# Altium PCB pyBehaviorLab_breakout_board.PcbDoc (part 3 of 4)
Units mm, origin at the board's own origin, x right, y up, seen from the top; angles counter-clockwise.
Board outline 190.01 x 159.89 mm, 2 copper layers (Top Layer, Bottom Layer); 146 components, 148 nets, 758 pads, 634 vias.
Unrouted connection lines stored in the file: 29.
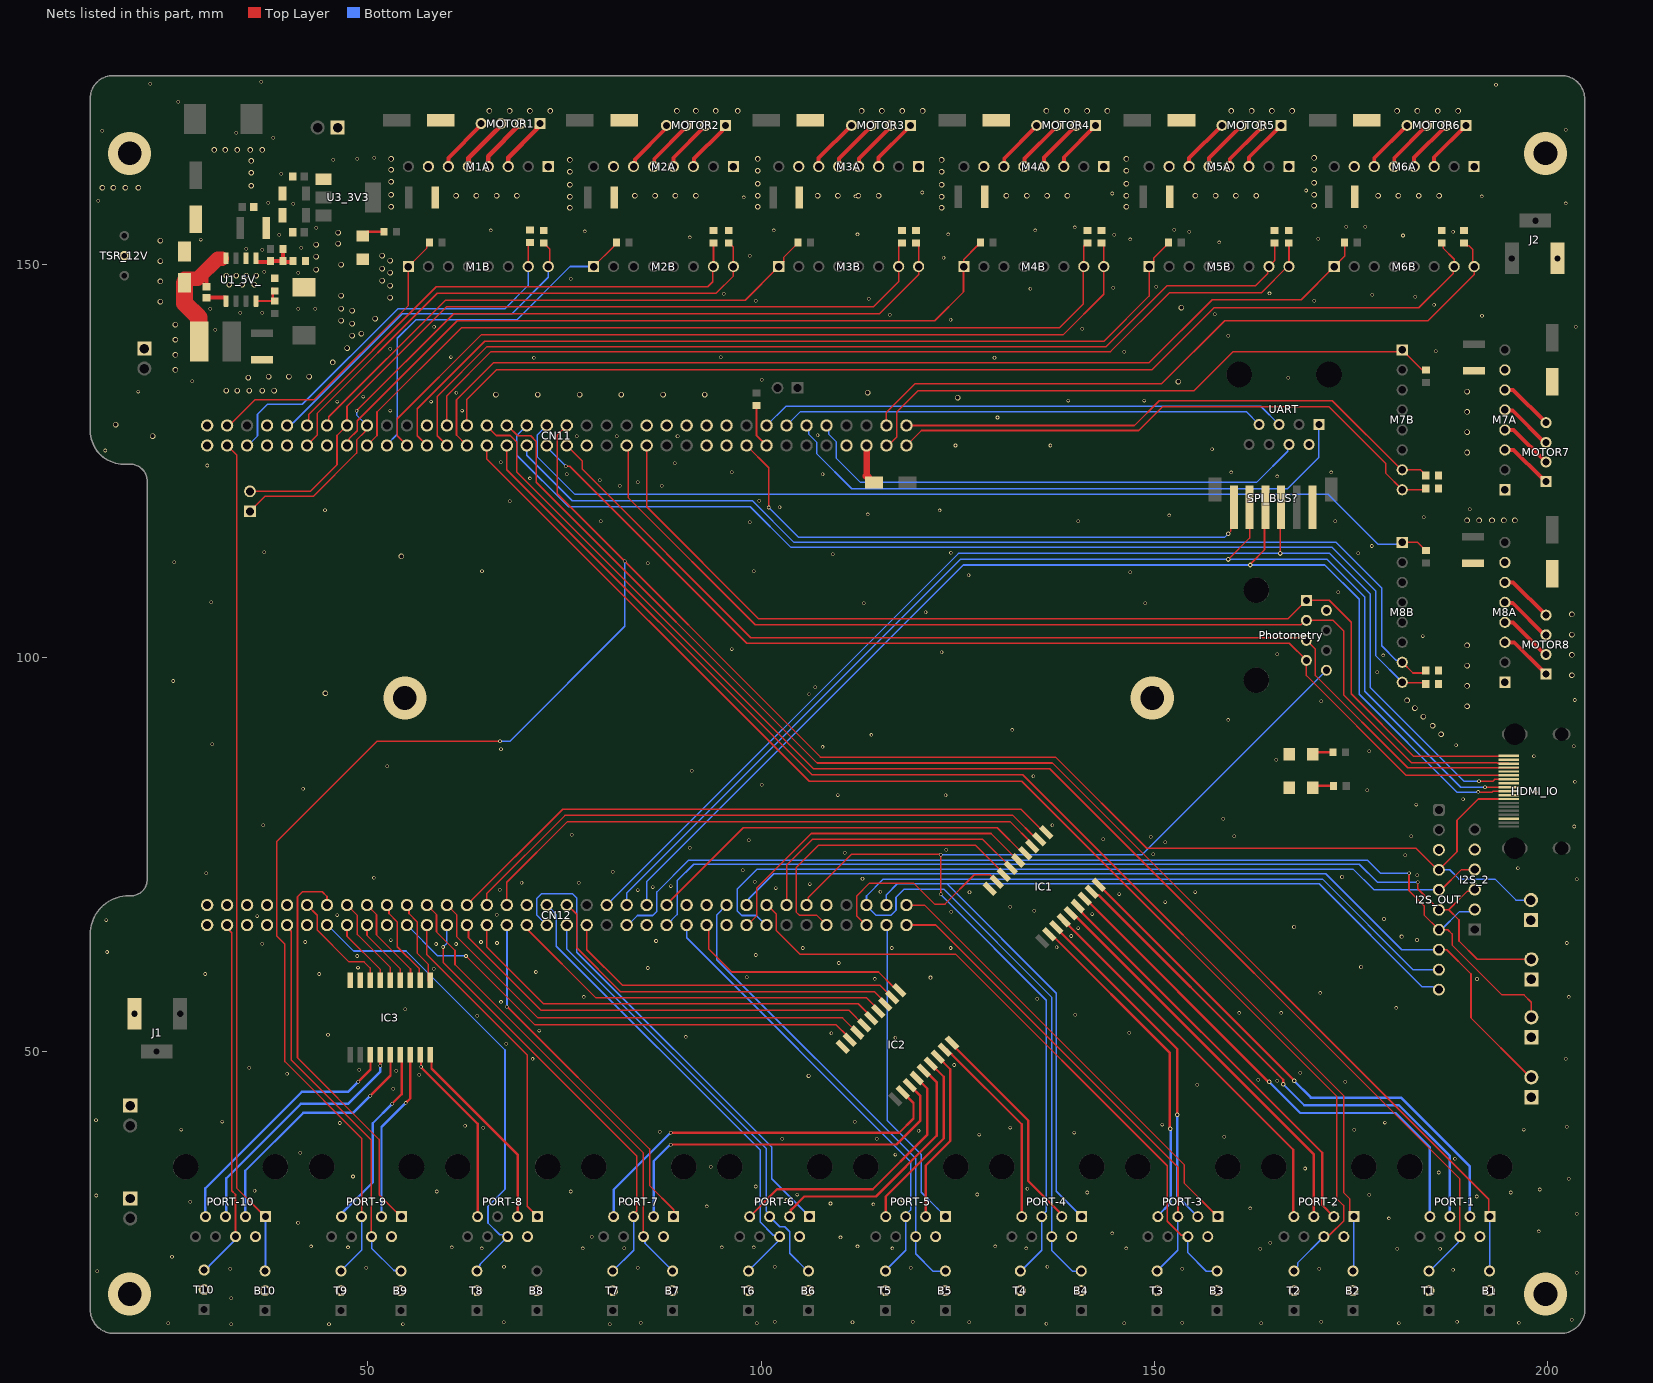
[diagram p2: the nets of this part, all layers, seen from the top]

## Via types
v1: diameter 0.45, hole 0.3, Top Layer to Bottom Layer, tented both sides, 413 vias
v2: diameter 0.7, hole 0.5, Top Layer to Bottom Layer, tented bottom, 173 vias
v3: diameter 0.6, hole 0.3, Top Layer to Bottom Layer, tented both sides, 12 vias
v4: diameter 0.5, hole 0.3, Top Layer to Bottom Layer, tented both sides, 10 vias
v5: diameter 0.5, hole 0.35, Top Layer to Bottom Layer, tented both sides, 7 vias
v6: diameter 5.5, hole 3, Top Layer to Bottom Layer, tented bottom, 6 vias
v7: diameter 0.6, hole 0.305, Top Layer to Bottom Layer, tented both sides, 6 vias
v8: diameter 0.8, hole 0.4, Top Layer to Bottom Layer, tented both sides, 2 vias
v9: diameter 0.45, hole 0.305, Top Layer to Bottom Layer, tented both sides, 2 vias
v10: diameter 0.7, hole 0.3, Top Layer to Bottom Layer, tented both sides, 1 vias
v11: diameter 0.4, hole 0.3, Top Layer to Bottom Layer, tented both sides, 1 vias
v12: diameter 3, hole 3, Top Layer to Bottom Layer, tented both sides, 1 vias

## Nets (pads, with @x,y where several pads share a name; then routed paths per layer and width w, separated by ;. In a path a pad name is that pad's centre, name@x,y a point inside that pad or via, vN(x,y) a via of type N, cw(c..) or ccw(c..) an arc to the next point about the centre after c; other vN are vias at no path point) (continued)
GND: 3V3.1 5V_OUT1.1 5V_OUT2.1 12V.1 12V_OUT1.1 12V_OUT2.1 +5V.1 B1.2 B2.2 B3.2 B4.2 B5.2 B6.2 B7.2 B8.2 B9.2 B10.2 C1.1 C2.1 C3.2 C5.1 C6.2 C7.1 C8.2 C9.2 C10.1 CN11.8 CN11.19 CN11.20 CN11.22 CN11.49 CN11.60 CN11.71 CN11.72 CN12.9 CN12.20 CN12.39 CN12.54 CN12.63 CN12.71 CN12.72 D3.2 HDMI_IO.2 HDMI_IO.5 HDMI_IO.8 HDMI_IO.11 HDMI_IO.17 I2S_2.5 I2S_OUT.3 IC1.9 IC2.9 IC3.8 IC3.9 IO1.1 IO2.1 IO3.1 IO4.1 J1.2 J2.2 M1A.1 M1A.7 M2A.1 M2A.7 M3A.1 M3A.7 M4A.1 M4A.7 M5A.1 M5A.7 M6A.1 M6A.7 M7A.1 M7A.7 M8A.1 M8A.7 MCAP1_A.1 MCAP1_B.2 MCAP2_A.1 MCAP2_B.2 MCAP3_A.1 MCAP3_B.2 MCAP4_A.1 MCAP4_B.2 MCAP5_A.1 MCAP5_B.2 MCAP6_A.1 MCAP6_B.2 MCAP7_A.1 MCAP7_B.2 MCAP8_A.1 MCAP8_B.2 Photometry.2 PORT-1.2 PORT-2.2 PORT-3.2 PORT-4.2 PORT-5.2 PORT-6.2 PORT-7.2 PORT-8.2 PORT-9.2 PORT-10.2 R2.2 R4.2 R13.2 R14.2 R16.2 R17.2 R19.2 R20.2 R22.2 R23.2 R25.2 R26.2 R28.2 R29.2 R31.2 R32.2 R34.2 R35.2 SPI_BUS?.6 T1.2 T2.2 T3.2 T4.2 T5.2 T6.2 T7.2 T8.2 T9.2 T10.2 TSR_12V.2 U1_5V_.6 U3_3V3.1 UART.2
  other v1: 32.621,15.275 45.067,15.275 54.465,15.275 80.754,15.275 136.271,15.367 24.62,15.402 99.423,15.402 146.159,15.402 163.558,15.402 181.084,15.402 84.709,15.494 153.543,15.494 196.342,15.494 67.292,15.529 111.615,15.529 126.474,15.529 101.727,15.621 119.253,15.621 171.196,15.621 188.468,15.621 203.073,15.875 32.621,18.577 203.708,21.844 15.603,22.006 187.96,22.225 32.512,22.352 153.543,22.352 170.942,22.352 49.784,22.479 84.328,22.479 118.999,22.479 67.31,22.606 101.727,22.606 136.398,22.606 25.106,23.85 163.449,24.892 180.848,24.892 186.309,24.892 64.498,24.927 77.325,24.927 116.695,24.927 133.713,24.927 146.413,24.927 82.605,24.937 47.48,25.054 60.688,25.054 94.978,25.054 99.042,25.054 42.781,25.181 112.25,25.181 129.776,25.181 164.719,25.654 110.091,26.324 78.453,26.43 144.635,26.832 198.864,27.086 179.814,28.737 203.708,29.337 162.161,30.007 93.073,30.261 172.72,30.48 114.282,30.515 108.821,30.642 82.677,30.734 27.432,30.861 99.296,30.896 117.965,31.023 103.224,31.088 190.99,31.531 15.476,31.658 177.292,31.75 104.597,31.775 127.49,31.785 141.46,32.039 195.308,32.039 58.783,32.166 75.801,32.166 35.599,32.276 198.965,32.42 133.858,32.512 99.296,32.801 202.692,33.782 48.115,34.071 186.164,34.579 169.146,35.087 93.591,35.331 188.205,36.311 117.076,36.865 41.402,37.084 102.687,38.862 114.692,38.885 158.877,39.116 127.744,39.405 139.809,39.659 87.122,39.751 120.015,39.878 175.387,40.005 26.271,40.04 196.959,40.04 64.69,40.275 131.681,40.294 202.438,40.386 62.357,40.513 150.985,40.675 46.446,40.873 179.306,40.929 111.887,41.021 31.502,41.056 15.443,41.24 53.213,45.212 155.43,45.755 174.244,46.101 165.626,46.246 163.195,46.355 56.554,47.006 39.733,47.152 168.529,47.244 53.594,47.498 48.895,47.625 34.907,47.914 124.551,48.248 70.939,49.013 202.311,49.022 67.611,50.939 117.076,51.724 90.42,51.812 44.94,52.105 108.939,52.297 146.794,52.359 71.786,52.624 63.909,54.511 139.936,54.645 160.782,54.864 166.116,54.864 54.774,55.335 180.721,55.499 66.929,56.261 135.11,56.677 77.47,56.896 202.692,56.896 171.069,57.404 114.427,59.182 98.171,59.38 29.337,59.817 43.815,59.817 71.374,60.071 58.367,60.482 85.598,60.579 48.751,60.632 109.855,61.214 48.641,62.103 99.314,62.23 16.849,62.613 105.283,63.119 116.594,63.119 124.079,63.119 137.556,63.218 58.674,63.627 61.214,63.627 36.558,63.662 66.421,63.754 202.438,63.754 42.037,63.881 64.389,63.881 52.893,64.131 139.446,64.643 140.335,65.659 16.764,66.675 35.941,67.183 46.101,67.31 66.402,67.345 142.113,67.437 124.188,67.726 134.729,67.853 131.681,68.361 151.384,68.961 145.542,69.977 126.489,70.198 155.194,70.231 115.171,70.266 84.328,70.485 66.784,70.52 101.854,70.739 86.233,70.866 88.519,70.993 106.172,71.247 69.54,71.409 76.817,71.409 99.169,71.536 203.708,71.882 112.885,71.917 50.782,72.044 183.388,72.39 29.464,72.644 81.135,72.806 97.663,73.025 196.215,73.279 181.864,74.93 149.86,75.057 110.644,75.238 123.545,75.617 90.914,75.854 151.384,76.581 98.425,76.835 143.51,76.962 149.517,77.247 160.147,77.343 182.626,77.343 75.928,77.505 203.388,78.566 36.703,78.74 137.033,78.74 158.732,79.537 183.261,81.359 189.23,82.042 123.444,82.55 109.728,82.567 198.501,82.931 177.038,83.185 41.765,83.347 100.058,83.855 203.457,84.239 134.62,84.963 91.168,85.633 52.451,86.233 165.463,87.03 198.247,87.503 177.292,88.138 66.929,88.392 107.805,88.681 203.327,88.773 188.341,88.9 30.226,89.027 114.028,90.205 131.935,90.84 159.367,92.11 171.196,94.488 203.436,94.65 150.477,96.174 106.864,96.267 25.255,97.063 178.308,98.171 179.102,100.307 165.608,100.457 122.936,100.711 96.248,101.127 184.132,102.778 120.904,105.791 113.03,106.934 148.844,106.934 30.099,107.061 173.355,108.331 126.365,110.49 146.939,110.871 64.516,110.998 99.042,111.033 85.58,112.049 25.382,112.176 109.093,113.157 175.895,113.284 124.132,113.372 36.83,113.411 177.623,114.227 98.534,117.256 140.335,117.348 172.974,117.348 79.611,117.383 184.259,117.891 151.892,118.11 113.538,118.237 122.682,118.745 44.559,118.78 190.101,118.907 102.344,119.161 68.054,119.923 99.764,119.966 82.024,121.864 87.358,121.864 84.31,122.336 79.496,122.602 70.612,122.809 165.608,123.063 75.293,123.352 107.805,123.352 159.766,123.571 172.466,123.571 96.248,123.606 29.591,124.46 89.009,124.749 66.878,124.864 16.637,126.365 157.323,126.539 136.779,127 76.563,128.178 81.643,128.178 107.17,128.305 52.832,131.445 61.976,131.445 46.101,132.588 58.039,132.588 139.065,132.715 148.717,132.715 49.403,133.223 61.269,133.688 20.828,133.858 27.69,135.171 100.092,135.366 167.005,135.636 71.12,138.176 129.667,138.176 94.887,138.235 60.571,138.247 146.177,138.938 185.783,138.973 52.832,139.319 159.385,140.97 30.607,141.732 140.843,141.859 58.42,142.113 203.581,142.113 124.079,143.002 191.643,143.51 116.332,143.637 157.686,143.699 33.782,143.891 36.576,143.891 29.972,144.399 41.148,144.399 43.307,144.399 185.547,144.907 99.314,145.415 170.307,145.415 113.665,145.669 183.134,145.923 177.673,146.177 95.25,146.304 164.628,146.329 134.239,146.939 144.78,147.066 150.241,147.193 75.819,148.209 41.148,148.971 36.83,149.098 123.19,150.876 98.552,151.13 36.576,151.892 34.544,152.019 41.529,152.146 158.224,152.816 28.778,153.184 146.921,153.197 170.815,153.289 90.914,153.451 38.735,153.797 144.907,153.797 112.25,153.832 123.807,153.832 154.432,154.178 187.96,154.178 77.579,154.213 65.641,154.34 101.582,154.34 134.856,154.34 152.527,154.432 43.434,154.686 139.885,154.719 174.371,154.813 176.784,154.813 40.513,157.734 202.293,157.769 37.338,157.861 15.748,158.115 97.772,158.531 111.996,158.658 191.625,158.658 144.635,159.039 120.505,159.166 169.273,159.42 38.989,161.544 45.593,163.322 48.641,163.449 50.8,163.576 37.973,166.116 33.274,166.751 16.256,167.005 202.311,167.132 25.908,170.688 193.421,172.847 22.352,172.974 36.449,173.228
  other v2: 186.436,90.297 185.358,91.375 184.191,92.542 183.113,93.62 189.738,93.853 182.125,94.608 44.619,95.504 189.738,96.435 203.073,97.79 189.738,99.018 203.073,100.372 189.738,101.6 203.073,102.955 203.073,105.537 54.271,112.903 189.738,117.475 191.262,117.475 192.913,117.475 194.437,117.475 195.834,117.475 189.738,126.111 22.629,128.202 189.738,128.693 17.949,129.667 189.738,131.276 124.968,133.096 66.294,133.477 71.603,133.477 76.911,133.477 82.22,133.477 87.528,133.477 92.837,133.477 113.538,133.731 189.738,133.858 32.004,133.985 33.401,133.985 34.925,133.985 36.576,133.985 38.1,133.985 153.035,135.128 34.798,135.636 37.38,135.763 39.963,135.763 42.545,135.763 25.527,136.605 45.539,137.561 25.527,138.526 47.365,139.387 25.527,140.446 48.006,140.97 49.191,141.213 25.527,142.367 48.006,142.494 46.609,142.875 50.927,143.129 48.006,144.145 46.609,144.399 153.416,144.526 23.622,145.288 52.832,145.796 46.609,146.05 52.832,147.32 32.385,147.447 34.036,147.447 35.56,147.447 23.622,147.87 51.816,147.955 32.004,148.59 33.274,148.59 34.544,148.59 35.814,148.59 52.832,148.971 43.434,149.352 51.816,149.479 46.609,149.987 23.622,150.453 52.832,150.495 43.434,151.003 51.816,151.13 43.434,152.527 46.228,152.654 23.622,153.035 46.228,154.051 75.692,157.226 122.936,157.226 52.959,157.353 99.568,157.353 146.431,157.353 170.307,157.48 75.692,158.623 122.936,158.623 61.214,158.75 63.796,158.75 66.379,158.75 68.961,158.75 83.947,158.75 86.529,158.75 89.112,158.75 91.694,158.75 99.568,158.75 107.188,158.75 109.77,158.75 112.353,158.75 114.935,158.75 131.191,158.75 133.773,158.75 136.356,158.75 138.938,158.75 146.431,158.75 155.194,158.75 157.776,158.75 160.359,158.75 162.941,158.75 178.435,158.75 181.017,158.75 183.6,158.75 186.182,158.75 52.959,158.877 170.307,158.877 16.256,159.766 17.653,159.766 19.177,159.766 20.828,159.766 35.179,160.02 75.692,160.147 122.936,160.147 99.568,160.274 146.431,160.274 170.307,160.401 52.959,160.528 35.179,161.671 75.692,161.798 122.936,161.798 99.568,161.925 146.431,161.925 52.959,162.052 170.307,162.052 35.179,163.195 75.692,163.322 122.936,163.322 52.959,163.449 99.568,163.449 146.431,163.449 170.307,163.576 30.48,164.592 31.877,164.592 33.401,164.592 35.052,164.592 36.576,164.592 65.447,169.545 68.03,169.545 70.612,169.545 73.194,169.545 89.281,169.545 91.694,169.545 94.234,169.545 97.028,169.545 112.776,169.545 115.358,169.545 117.941,169.545 120.523,169.545 136.271,169.545 138.853,169.545 141.436,169.545 144.018,169.545 159.766,169.545 162.348,169.545 164.931,169.545 167.513,169.545 180.848,169.545 183.43,169.545 186.013,169.545 188.595,169.545
  other v4: 41.148,28.194 106.045,46.863 121.529,59.351 86.661,64.014 124.714,127 89.389,128.178 130.048,130.556 181.592,153.705
  other v5: 191,59.192 176.276,60.706 183.388,64.135 181.429,64.557 167.767,65.786 179.197,66.802 173.863,72.136
  other v6: 19.714,19.132 199.714,19.132 54.714,94.904 149.71,94.904 19.714,164.132 199.714,164.132
  other v11: 106.107,95.37
M1_1A: M1A.4 M2A.4 M3A.4 M4A.4 M5A.4 M6A.4 M7A.4 M8A.4 MOTOR1.2 MOTOR2.2 MOTOR3.2 MOTOR4.2 MOTOR5.2 MOTOR6.2 MOTOR7.2 MOTOR8.2 | length 55.6
  Top Layer w0.5: M2A.4@88.859,162.467 88.859,163.584 92.949,167.674 MOTOR2.2@92.949,167.697 ; M3A.4@112.4,162.467 112.432,162.499 112.432,163.503 116.49,167.561 MOTOR3.2@116.49,167.697 ; M4A.4@135.941,162.467 135.941,163.607 MOTOR4.2@140.031,167.697 ; M5A.4@159.482,162.467 159.577,162.562 159.577,163.44 163.4,167.262 163.4,167.525 MOTOR5.2@163.572,167.697 ; M6A.4@183.023,162.467 183.023,163.607 MOTOR6.2@187.113,167.697 ; M8A.4@194.55,104.523 194.584,104.489 195.585,104.489 199.642,100.433 MOTOR8.2@199.781,100.433 ; M7A.4@194.55,128.99 195.666,128.99 MOTOR7.2@199.756,124.9
  Top Layer w0.6: M1A.4@65.318,162.467 65.318,163.789 69.408,167.879 MOTOR1.2@69.408,167.929
M1_1B: M1A.3 M2A.3 M3A.3 M4A.3 M5A.3 M6A.3 M7A.3 M8A.3 MOTOR1.1 MOTOR2.1 MOTOR3.1 MOTOR4.1 MOTOR5.1 MOTOR6.1 MOTOR7.1 MOTOR8.1 | length 55.5
  Top Layer w0.5: M2A.3@91.399,162.467 91.466,162.533 91.466,163.469 94.999,167.002 94.999,167.247 MOTOR2.1@95.449,167.697 ; M3A.3@114.94,162.467 114.94,163.603 118.54,167.203 118.54,167.247 118.946,167.653 MOTOR3.1@118.99,167.653 ; M4A.3@138.481,162.467 138.481,163.647 MOTOR4.1@142.531,167.697 ; M5A.3@162.022,162.467 162.022,163.647 MOTOR5.1@166.072,167.697 ; M6A.3@185.563,162.467 185.563,163.647 MOTOR6.1@189.613,167.697 ; M8A.3@194.55,101.983 195.741,101.983 199.331,98.393 199.331,98.383 199.77,97.943 MOTOR8.1@199.781,97.943 ; M7A.3@194.55,126.45 195.666,126.45 199.266,122.85 199.331,122.85 MOTOR7.1@199.781,122.4
  Top Layer w0.6: M1A.3@67.858,162.467 67.858,163.608 71.508,167.258 71.508,167.529 MOTOR1.1@71.908,167.929
M1_2A: M1A.5 M2A.5 M3A.5 M4A.5 M5A.5 M6A.5 M7A.5 M8A.5 MOTOR1.3 MOTOR2.3 MOTOR3.3 MOTOR4.3 MOTOR5.3 MOTOR6.3 MOTOR7.3 MOTOR8.3 | length 55.8
  Top Layer w0.5: M2A.5@86.319,162.467 86.415,162.563 86.415,163.439 90.449,167.473 MOTOR2.3@90.449,167.697 ; M3A.5@109.86,162.467 109.923,162.53 109.923,163.472 113.99,167.538 MOTOR3.3@113.99,167.697 ; M4A.5@133.401,162.467 133.474,162.54 133.474,163.462 137.531,167.519 MOTOR4.3@137.531,167.697 ; M5A.5@156.942,162.467 156.942,163.567 MOTOR5.3@161.072,167.697 ; M6A.5@180.483,162.467 180.483,163.567 MOTOR6.3@184.613,167.697 ; M8A.5@194.55,107.063 194.623,106.99 195.547,106.99 199.604,102.933 MOTOR8.3@199.781,102.933 ; M7A.5@194.55,131.53 194.623,131.457 195.546,131.457 199.604,127.4 MOTOR7.3@199.781,127.4
  Top Layer w0.6: M1A.5@62.778,162.467 62.786,162.475 62.786,163.539 66.755,167.509 66.755,167.776 MOTOR1.3@66.908,167.929
M1_2B: M1A.6 M2A.6 M3A.6 M4A.6 M5A.6 M6A.6 M7A.6 M8A.6 MOTOR1.4 MOTOR2.4 MOTOR3.4 MOTOR4.4 MOTOR5.4 MOTOR6.4 MOTOR7.4 MOTOR8.4 | length 55.9
  Top Layer w0.5: M1A.6@60.238,162.467 60.238,163.567 64.408,167.737 MOTOR1.4@64.408,167.929 ; M2A.6@83.779,162.467 83.943,162.631 83.943,163.371 87.777,167.204 87.777,167.525 MOTOR2.4@87.949,167.697 ; M3A.6@107.321,162.467 107.321,163.534 MOTOR3.4@111.483,167.697 ; M4A.6@130.861,162.467 130.909,162.514 130.909,163.488 135.031,167.61 MOTOR4.4@135.031,167.697 ; M5A.6@154.402,162.467 154.406,162.471 154.406,163.531 MOTOR5.4@158.572,167.697 ; M6A.6@177.943,162.467 177.947,162.471 177.947,163.531 MOTOR6.4@182.113,167.697 ; M8A.6@194.55,109.603 194.569,109.584 195.601,109.584 199.752,105.433 MOTOR8.4@199.781,105.433 ; M7A.6@194.55,134.07 194.567,134.053 195.602,134.053 MOTOR7.4@199.755,129.9
MCU_3V3: CN11.16 DNP.2 | length 5.3
  Top Layer w0.25: DNP.2@99.426,131.761 99.426,128.267 CN11.16@100.693,127
MCU_5V: CN11.6 D1.1 | length 5.3
  Top Layer w0.8: CN11.6@113.393,127 113.412,126.981 113.412,123.13 ; D1.1@113.58,122.962 113.58,122.661 113.955,122.286 D1.1@114.33,122.286
  Top Layer w1: 113.412,123.13 D1.1@113.58,122.962
Net2K2_1: 2K2.1 12V.2 | length 2.8
  Top Layer w0.3: 12V.2@170.103,83.485 170.348,83.73 2K2.1@172.782,83.73
Net470_1: 3V3.2 220.1 470.1 +5V.2 | length 5.6
  Top Layer w0.3: 3V3.2@49.365,153.634 49.909,154.178 52.04,154.178 220.1@52.042,154.176 ; +5V.2@170.103,87.739 170.363,87.998 470.1@172.711,87.998
NetC4_1: C4.1 D3.1 I1.1 U1_5V_.8 | length 16
  Top Layer w0.5: 29.112,148.942 29.497,148.557 C4.1@29.497,147.208
  Top Layer w1.8: D3.1@26.689,148.209 28.378,148.209 30.918,150.749 31.449,150.749
  Top Layer w2.2: D3.1@26.689,147.67 26.689,145.092 28.497,143.284 28.497,140.277 I1.1@28.572,140.202
NetC4_2: C4.2 U1_5V_.1 | length 2.9
  Top Layer w0.5: C4.2@29.497,145.758 29.542,145.803 31.926,145.803 31.976,145.753 U1_5V_.1@31.976,145.363
NetR1_2: R1.2 R2.1 R5.1 R5.2 U1_5V_.5 | length 7.4
  Top Layer w0.5: U1_5V_.5@35.786,150.774 35.786,150.399 35.836,150.349 R5.1@37.796,150.349 ; R5.1@37.614,150.476 39.207,150.476 R5.2@39.238,150.507 ; R1.2@39.087,152.23 39.238,152.079 R5.2@39.238,150.507 ; R5.2@39.269,150.349 R2.1@40.59,150.349 ; R5.2@39.396,150.349 R5.2@39.238,150.507
NetR3_2: R3.2 R4.1 U1_5V_.4 | length 3.8
  Top Layer w0.3: U1_5V_.4@35.786,145.363 37.886,145.363 R3.2@37.914,145.391 ; R3.2@37.914,145.264 R4.1@37.914,146.918
PA0_CMD: CN11.28 HDMI_IO.1 Photometry.1 | length 137.8
  Top Layer w0.2: CN11.28@85.453,127 85.453,119.199 99.692,104.959 166.963,104.959 Photometry.1@169.319,107.315 172.212,107.315 175.01,104.517 175.01,95.439 182.947,87.503 193.614,87.503 193.62,87.508 193.727,87.508 194.994,87.508 HDMI_IO.1@195.044,87.558
PA1_ADC1: CN11.30 HDMI_IO.3 Photometry.3 | length 137.9
  Top Layer w0.2: CN11.30@82.913,127 83.083,126.83 83.083,120.381 99.264,104.2 168.646,104.2 169.221,104.775 172.705,104.775 174.043,103.438 174.043,95.324 182.714,86.653 193.575,86.653 193.62,86.608 194.994,86.608 HDMI_IO.3@195.044,86.558
PA2_ADC2: CN12.35 IC2.3 | length 47.8
  Top Layer w0.2: CN12.35@75.293,68.58 75.387,68.58 76.549,67.418 76.549,63.151 82.128,57.572 114.404,57.572 IC2.3@115.531,56.445
PA3_ADC3: CN12.37 PORT-6.4 T6.3 | length 60.9
  Bottom Layer w0.2: CN12.37@72.753,68.58 72.753,68.344 72.989,68.344 73.968,67.365 73.968,65.786 ; 73.969,65.785 73.969,63.357 99.875,37.451 99.875,28.277 101.536,26.616 102.164,26.616 PORT-6.4@102.357,26.423 102.128,26.193 102.128,25.809 T6.3@98.398,22.079
PA5_I2S1_SCK: CN12.11 Photometry.8 PORT-4.5 T4.3 | length 138.8
  Top Layer w0.2: CN12.11@105.773,68.58 105.968,68.775 105.968,69.519 111.501,75.052 122.775,75.052 v9@122.829,74.998 ; v9(122.816,74.986) v9@122.829,74.998 ; v9(122.856,69.965) 122.836,69.985 122.836,74.991 v9@122.829,74.998
  Bottom Layer w0.2: v9(122.816,74.986) 122.816,74.991 122.826,75.001 148.435,75.001 Photometry.8@171.859,98.425 ; v9(122.856,69.965) 122.856,69.898 122.981,69.773 122.981,69.752 136.249,56.483 136.249,29.638 135.677,29.065 135.677,24.712 T4.3@133.003,22.038
PA6: CN12.13 IC1.6 | length 36.4
  Top Layer w0.2: CN12.13@103.251,68.58 103.251,73.66 106.54,76.949 128.154,76.949 IC1.6@131.76,73.344
PA7_I2S1_SD: B3.3 CN12.15 PORT-3.4 | length 83.1
  Top Layer w0.2: CN12.15@100.693,68.58 100.763,68.58 101.913,67.431 101.913,65.346 104.909,62.35 124.721,62.35 151.641,35.43 151.641,28.38 153.412,26.608 154.056,26.608 PORT-3.4@154.241,26.423
  Bottom Layer w0.2: PORT-3.4@154.241,26.423 154.241,24.398 156.602,22.038 B3.3@157.965,22.038
PA8: CN12.23
PA9: CN12.21
PA13: CN11.13 UART.7 | length 61.5
  Bottom Layer w0.2: CN11.13@103.233,129.54 105.011,131.318 161.66,131.318 UART.7@163.304,129.674
PA14: CN11.15 UART.5 | length 67.1
  Bottom Layer w0.2: CN11.15@100.693,129.54 103.155,132.002 163.516,132.002 UART.5@165.844,129.674
PA15_NCS: CN11.17 SPI_BUS?.1 | length 72.9
  Top Layer w0.2: CN11.17@98.153,127 100.965,124.188 v4(100.965,119.126) ; v7(159.374,115.781) 159.377,115.781 159.721,116.125 159.721,118.783 SPI_BUS?.1@160.1,119.162
  Bottom Layer w0.2: v4(100.965,119.126) 104.775,115.316 158.908,115.316 v7(159.374,115.781)
PB0_LG: CN11.34
PB1: CN12.24 PORT-5.5 T5.3 | length 57.2
  Bottom Layer w0.2: CN12.24@90.533,66.04 90.533,64.407 119.001,35.939 119.001,29.811 118.382,29.192 118.382,24.712 T5.3@115.708,22.038
PB2: CN12.22 IC2.1 | length 28.8
  Top Layer w0.2: CN12.22@93.073,66.04 93.332,65.781 93.332,63.005 96.266,60.071 114.924,60.071 116.786,58.21 116.969,58.21 IC2.1@117.001,58.241
PB3_SCK: CN12.31 HDMI_IO.7 SPI_BUS?.4 | length 158.2
  Top Layer w0.2: v7(165.989,113.284) 165.989,119.051 SPI_BUS?.4@166.1,119.162 ; v1(191.262,84.328) 193.031,84.328 193.261,84.558 HDMI_IO.7@195.044,84.558
  Bottom Layer w0.2: CN12.31@80.373,68.58 125.077,113.284 v7(165.989,113.284) 172.289,113.284 177.448,108.126 177.448,96.237 189.357,84.328 v1(191.262,84.328)
PB4_MISO: CN12.27 HDMI_IO.10 SPI_BUS?.3 | length 156.5
  Top Layer w0.2: v7(162.196,111.809) 162.196,111.918 162.357,112.079 162.357,112.097 163.996,113.736 163.996,119.058 SPI_BUS?.3@164.1,119.162 ; v1(191.157,82.957) 191.205,82.91 191.382,82.91 191.391,82.901 192.882,82.901 193.048,83.066 HDMI_IO.10@195.036,83.066
  Bottom Layer w0.2: CN12.27@85.453,68.58 85.453,71.561 125.702,111.809 v7(162.196,111.809) 171.655,111.809 176.022,107.442 176.022,95.377 188.476,82.923 191.122,82.923 v1(191.157,82.957)
PB5_MOSI: CN12.29 HDMI_IO.9 SPI_BUS?.2 | length 158
  Top Layer w0.2: v7(159.385,112.522) 162.1,115.237 SPI_BUS?.2@162.1,119.162 ; v1(192.024,83.566) 192.028,83.562 195.04,83.562 HDMI_IO.9@195.044,83.558
  Bottom Layer w0.2: CN12.29@82.913,68.58 82.913,70.108 125.327,112.522 v7(159.385,112.522) 171.967,112.522 176.735,107.754 176.735,95.756 188.925,83.566 v1(192.024,83.566)
PB6: CN12.18 I2S_OUT.8 IO1.2 | length 115.5
  Top Layer w0.2: I2S_OUT.8@186.164,62.9 187.163,62.9 190.246,59.817 190.246,54.229 IO1.2@197.713,46.762
  Bottom Layer w0.2: CN12.18@98.153,68.58 98.415,68.842 98.415,69.366 101.601,72.552 171.774,72.552 181.426,62.9 I2S_OUT.8@186.164,62.9
PB7_LR: CN11.21
PB8_I2C1_SCL: CN12.3 I2S_OUT.10 PORT-4.1 | length 127.2
  Bottom Layer w0.2: CN12.3@115.931,68.582 115.931,69.892 117.313,71.274 123.624,71.274 ; PORT-4.1@140.757,28.963 137.53,32.19 137.53,57.369 123.624,71.274 ; I2S_OUT.10@186.11,57.476 186.11,57.516 185.456,58.17 184.058,58.17 170.955,71.274 123.624,71.274
PB9_I2C1_SDA: B4.3 CN12.5 I2S_OUT.9 PORT-4.4 | length 148.8
  Bottom Layer w0.2: B4.3@140.671,22.038 139.576,22.038 136.947,24.667 PORT-4.4@136.947,26.423 136.927,26.442 136.927,56.884 123.202,70.609 118.192,70.609 117.148,69.564 117.148,67.923 116.517,67.292 114.593,67.292 113.393,68.491 CN12.5@113.393,68.58 113.393,69.744 115.531,71.882 171.351,71.882 182.874,60.36 I2S_OUT.9@186.164,60.36
PB10: CN12.25 IC1.4 | length 51
  Top Layer w0.2: CN12.25@87.993,68.58 87.993,68.67 97.737,78.415 130.027,78.415 133.302,75.14 IC1.4@133.556,75.14
PB11: CN12.17 IC1.5 | length 42.8
  Top Layer w0.2: CN12.17@98.153,66.04 98.257,66.04 99.418,67.2 99.418,70.716 106.377,77.675 129.224,77.675 IC1.5@132.658,74.242
PB12_I2S2_WS: CN12.16 I2S_2.4 I2S_OUT.5 | length 104.2
  Top Layer w0.2: I2S_OUT.5@186.164,70.52 186.471,70.52 189.043,73.092 I2S_2.4@190.724,73.092
  Bottom Layer w0.2: CN12.16@100.693,66.04 100.603,66.04 99.388,67.255 97.524,67.255 96.938,67.841 96.938,70.575 99.52,73.156 175.256,73.156 177.87,70.542 185.304,70.542 186.142,70.542 I2S_OUT.5@186.164,70.52
PB13_I2S2_SCK: CN12.30 I2S_2.2 I2S_OUT.7 IO2.2 | length 137.7
  Top Layer w0.2: v1(182.365,72.619) 182.365,70.408 184.277,68.495 184.277,67.327 I2S_OUT.7@186.164,65.44 187.29,65.44 187.833,64.897 187.833,63.5 194.183,57.15 196.977,57.15 197.914,56.213 IO2.2@197.914,54.31
  Bottom Layer w0.2: CN12.30@82.913,66.04 83.063,66.04 84.278,67.255 86.226,67.255 86.757,67.786 86.757,70.247 90.805,74.295 177.038,74.295 178.69,72.643 182.34,72.643 v1(182.365,72.619) ; I2S_OUT.7@186.164,65.44 186.471,65.44 188.785,67.754 190.466,67.754 I2S_2.2@190.724,68.012
PB14_LB: CN12.28
PB15_I2S2_SD: CN12.26 I2S_2.3 I2S_OUT.6 IO3.2 | length 127.1
  Top Layer w0.2: v1(183.482,71.47) 183.482,70.662 I2S_OUT.6@186.164,67.98 187.417,67.98 ; I2S_2.3@190.724,70.552 190.531,70.359 189.797,70.359 187.417,67.98 ; IO3.2@197.914,61.676 191.054,61.676 188.722,64.008 188.722,66.675 187.417,67.98
  Bottom Layer w0.2: CN12.26@87.993,66.04 89.319,67.366 89.319,68.075 89.318,68.077 89.318,69.083 89.319,69.085 89.319,71.657 91.431,73.769 176.04,73.769 178.313,71.496 183.456,71.496 v1(183.482,71.47)
PC0_ADC: CN11.38 HDMI_IO.6 Photometry.7 | length 142.1
  Top Layer w0.2: v1(75.174,124.368) 75.667,124.368 98.166,101.869 167.145,101.869 Photometry.7@169.319,99.695 169.319,97.762 181.991,85.09 HDMI_IO.6@196.215,85.09
  Bottom Layer w0.2: CN11.38@72.753,127 72.753,126.825 75.174,124.404 v1(75.174,124.368)
PC1_ADC: CN11.36 HDMI_IO.4 Photometry.5 | length 140.4
  Top Layer w0.2: CN11.36@75.293,127 77.269,125.024 77.269,124 98.692,102.577 168.652,102.577 168.994,102.235 Photometry.5@169.319,102.235 170.47,101.084 170.47,97.754 182.189,86.035 HDMI_IO.4@196.221,86.035
PC2: CN11.35 HDMI_IO.12 I2S_OUT.4 IO4.2 PORT-9.5 T9.3 | length 293.5
  Top Layer w0.2: PORT-9.5@49.204,28.963 49.204,38.934 39.46,48.678 39.46,63.604 38.426,64.638 38.426,76.653 51.181,89.408 v1(66.802,89.408) ; CN11.35@75.293,129.54 74.078,128.325 74.078,120.852 107.542,87.389 137.418,87.389 149.012,75.795 183.262,75.795 I2S_OUT.4@185.997,73.06 ; I2S_OUT.4@186.164,73.06 186.471,73.06 186.471,73.366 188.468,75.364 188.468,79.375 191.151,82.058 HDMI_IO.12@195.044,82.058
  Bottom Layer w0.2: T9.3@46.53,22.038 49.204,24.712 PORT-9.5@49.204,28.963 ; v1(66.802,89.408) 68.065,89.408 82.677,104.02 v1(82.677,112.268) ; I2S_OUT.4@185.997,73.06 187.544,73.06 188.722,71.882 193.294,71.882 195.961,69.215 IO4.2@197.866,69.215
PC3: CN11.37 M8B.1 R33.2 | length 122.6
  Top Layer w0.2: M8B.1@181.503,114.683 183.472,114.683 184.487,113.668 R33.2@184.537,113.668
  Bottom Layer w0.2: CN11.37@72.753,129.54 71.518,128.305 71.518,125.603 76.344,120.777 172.097,120.777 178.417,114.457 181.278,114.457 M8B.1@181.503,114.683
PC4: CN12.34 IC2.2 | length 43.8
  Top Layer w0.2: CN12.34@77.833,66.04 77.833,62.908 82.363,58.378 115.115,58.378 IC2.2@116.15,57.343
PC5: CN12.6 IC1.8 | length 25.7
  Top Layer w0.2: CN12.6@113.393,66.04 113.302,66.04 112.178,67.164 112.178,69.76 113.792,71.374 119.38,71.374 122.047,68.707 123.372,68.707 127.095,72.431 129.081,72.431 IC1.8@129.964,71.548
PC6_UART6_TX: CN12.4 PORT-5.1 | length 40.2
  Bottom Layer w0.2: CN12.4@115.933,66.04 116.015,65.958 116.015,41.211 120.344,36.882 120.344,32.073 122.41,30.007 122.418,30.007 PORT-5.1@123.462,28.963
PC7_UART6_RX: B5.3 CN12.19 PORT-5.4 | length 60
  Bottom Layer w0.2: CN12.19@95.613,68.58 94.363,67.33 94.363,61.64 119.674,36.329 119.674,26.444 PORT-5.4@119.652,26.423 119.652,24.235 121.85,22.038 B5.3@123.376,22.038
PC8: CN12.2 PORT-3.5 T3.3 | length 61.6
  Top Layer w0.2: CN12.2@118.473,66.04 122.194,66.04 152.992,35.243 152.992,28.983 PORT-3.5@152.971,28.963
  Bottom Layer w0.2: T3.3@150.297,22.038 152.971,24.712 PORT-3.5@152.971,28.963
PC9: CN12.1 PORT-3.1 | length 57.4
  Top Layer w0.2: CN12.1@118.473,68.58 120.777,68.58 153.768,35.589 153.768,33.245 PORT-3.1@158.051,28.963
PC10: CN11.1 M7B.7 R31.1 | length 71.3
  Top Layer w0.2: CN11.1@118.473,129.54 147.452,129.54 150.616,132.704 172.604,132.704 181.398,123.91 M7B.7@181.503,123.91 183.836,123.91 184.487,123.258 R31.1@184.487,123.208
PC11: CN11.2 M7B.8 R32.1 | length 73.5
  Top Layer w0.2: CN11.2@118.473,127 120.38,128.907 148.004,128.907 151.023,131.926 172.196,131.926 179.382,124.74 179.382,123.491 M7B.8@181.503,121.37 R32.1@184.785,121.37
PC12: CN11.3 M6B.8 R29.1 | length 88.3
  Top Layer w0.2: CN11.3@115.933,129.54 115.933,131.226 119.581,134.874 150.942,134.874 158.938,142.871 184.781,142.871 190.643,148.733 M6B.8@190.643,149.753 190.478,149.918 190.478,151.914 189.99,152.402 189.757,152.402 189.551,152.608 R29.1@189.551,152.841
PC13: CN11.23
PC14: CN11.25
PC15: CN11.27
PD0: CAN.2 CN11.57 M3B.7 R19.1 | length 102.2
  Top Layer w0.2: CAN.2@35.017,121.18 42.705,121.18 46.086,124.561 46.086,128.273 CN11.57@47.353,129.54 47.353,132.005 60.001,144.653 114.3,144.653 117.483,147.836 M3B.7@117.483,149.753 117.483,152.361 117.858,152.737 R19.1@117.908,152.737
PD1: CAN.1 CN11.55 M3B.8 R20.1 | length 105.9
  Top Layer w0.2: CAN.1@35.017,118.64 36.904,120.527 43.057,120.527 48.568,126.038 48.568,127.693 49.631,128.756 49.631,129.278 CN11.55@49.893,129.54 ; v1(48.568,131.416) 60.916,143.764 115.062,143.764 120.023,148.725 M3B.8@120.023,149.753 120.023,152.4 R20.1@119.685,152.737
  Bottom Layer w0.2: v1(48.568,131.416) 48.568,130.865 CN11.55@49.893,129.54
PD2: CN11.4 M7B.1 R30.2 | length 76.7
  Top Layer w0.2: CN11.4@115.933,127 116.147,127 117.258,128.111 117.258,131.281 119.962,133.985 155.067,133.985 160.02,138.938 M7B.1@181.737,138.938 ; M7B.1@181.503,139.15 184.023,136.63 184.518,136.63 R30.2@184.537,136.611
PD3: CN11.40 M8B.7 R34.1 | length 131.4
  Top Layer w0.2: M8B.7@181.503,99.443 182.864,98.083 184.19,98.083 R34.1@184.487,98.38
  Bottom Layer w0.2: CN11.40@70.213,127 70.213,125.765 76.004,119.974 98.895,119.974 104.188,114.681 173.101,114.681 178.892,108.89 178.892,101.541 180.756,99.677 181.269,99.677 M8B.7@181.503,99.443
PD4_UART2_RTS: CN11.39 M8B.8 R35.1 | length 136.9
  Top Layer w0.2: M8B.8@181.503,96.903 181.571,96.836 184.355,96.836 R35.1@184.487,96.703
  Bottom Layer w0.2: CN11.39@70.213,129.54 70.213,129.194 69.867,129.194 68.943,128.27 68.943,125.765 75.505,119.202 98.627,119.202 103.784,114.046 172.593,114.046 178.156,108.483 178.156,100.25 M8B.8@181.503,96.903
PD5_UART2_TX: B1.3 CN11.41 PORT-1.1 | length 177.8
  Top Layer w0.2: CN11.41@67.673,129.54 67.732,129.54 69.047,128.225 70.707,128.225 71.428,127.503 71.428,122.322 107.113,86.637 137.03,86.637 192.486,31.181 192.486,29.117 PORT-1.1@192.64,28.963
  Bottom Layer w0.2: B1.3@192.554,22.038 192.64,22.124 PORT-1.1@192.64,28.963
PD6_UART2_RX: CN11.43 PORT-1.4 T1.3 | length 178.8
  Top Layer w0.2: CN11.43@65.133,129.54 65.133,129.452 66.315,128.27 68.121,128.27 68.916,127.476 68.916,123.656 106.655,85.917 136.682,85.917 188.833,33.766 PORT-1.4@188.833,26.425
  Bottom Layer w0.2: T1.3@185.166,22.225 188.601,25.66 188.601,25.938 PORT-1.4@189.085,26.423
PD7: CN11.45 M6B.7 R28.1 | length 139.8
  Top Layer w0.2: CN11.45@62.593,129.54 62.593,132.845 66.4,136.652 149.733,136.652 157.58,144.499 183.615,144.499 187.973,148.857 187.973,149.623 M6B.7@188.103,149.753 188.103,150.687 186.69,152.1 R28.1@186.69,152.716
PD8: CN12.10 IC1.7 | length 39.4
  Top Layer w0.2: CN12.10@108.313,66.04 107.044,67.309 104.839,67.309 104.448,67.701 104.448,73.333 107.315,76.2 127.215,76.2 130.862,72.553 IC1.7@130.862,72.446
PD9: CN11.69 M1B.1 R12.2 | length 38.5
  Top Layer w0.2: CN11.69@32.113,129.54 32.379,129.54 35.673,132.835 43.191,132.835 55.162,144.806 M1B.1@55.162,149.753 57.466,152.056 57.466,152.437 R12.2@57.816,152.787
PD10: CN12.65
PD11: CN12.45 IC1.1 | length 79.9
  Top Layer w0.2: CN12.45@62.593,68.58 74.769,80.756 133.036,80.756 135.958,77.834 IC1.1@136.25,77.834
PD12: CN12.43 IC1.2 | length 77
  Top Layer w0.2: CN12.43@65.133,68.58 65.133,70.041 75.063,79.97 132.013,79.97 135.048,76.936 IC1.2@135.352,76.936
PD13: CN12.41 IC1.3 | length 74.4
  Top Layer w0.2: CN12.41@67.673,68.58 67.673,71.474 75.392,79.192 131.644,79.192 134.454,76.382 IC1.3@134.454,76.038
PD14: CN12.46 IC2.6 | length 56.6
  Top Layer w0.2: CN12.46@62.593,66.04 62.797,65.836 62.797,64.435 72.052,55.18 111.189,55.18 IC2.6@113.091,53.278
PD15: CN12.48 PORT-7.5 T7.3 | length 55.8
  Top Layer w0.2: v1(59.563,63.246) 59.563,61.325 84.199,36.689 84.199,29.68 83.793,29.274 PORT-7.5@83.793,28.963 ; CN12.48@60.053,66.04 CN12.48@60.198,65.895
  Bottom Layer w0.2: v1(59.563,63.246) 60.053,63.736 60.053,65.75 CN12.48@60.198,65.895 ; T7.3@81.119,22.038 83.793,24.712 PORT-7.5@83.793,28.963
PE0_UART8_RX: B9.3 CN12.64 PORT-9.4 | length 50.5
  Top Layer w0.2: CN12.64@39.733,66.04 39.733,65.775 40.27,65.238 40.27,48.877 50.419,38.728 50.419,26.477 PORT-9.4@50.474,26.423
  Bottom Layer w0.2: PORT-9.4@50.474,26.423 50.474,24.964 53.315,22.123 54.112,22.123 B9.3@54.196,22.039
PE1_UART8_TX: CN11.61 M2B.7 R16.1 | length 64.4
  Top Layer w0.2: CN11.61@42.273,129.54 42.51,129.777 42.51,130.988 58.715,147.193 93.218,147.193 93.835,147.81 M2B.7@93.835,149.387 ; M2B.7@93.942,149.753 93.942,152.736 R16.1@93.944,152.737
PE2: CN11.46 M6B.1 R27.2 | length 128.5
  Top Layer w0.2: CN11.46@62.593,127 61.271,128.322 61.271,132.806 65.976,137.511 149.322,137.511 157.353,145.542 168.652,145.542 M6B.1@172.863,149.753 174.187,151.077 R27.2@174.187,152.787
PE3: CN11.47 M5B.8 R26.1 | length 120.6
  Top Layer w0.2: CN11.47@60.053,129.54 60.053,133.332 65.659,138.938 144.416,138.938 151.909,146.431 163.605,146.431 166.927,149.753 M5B.8@167.103,149.753 167.103,152.705 R26.1@167.071,152.737
PE4: CN11.48 M5B.7 R25.1 | length 123
  Top Layer w0.2: CN11.48@60.053,127 58.813,128.24 58.813,133.235 65.151,139.573 143.875,139.573 151.609,147.307 162.839,147.307 164.408,148.876 164.408,149.615 165.27,150.477 R25.1@165.27,152.737
PE5: CN11.50 M5B.1 R24.2 | length 111.1
  Top Layer w0.2: CN11.50@57.513,127 56.273,128.24 56.273,131.679 64.852,140.259 143.573,140.259 149.321,146.007 M5B.1@149.321,149.751 ; M5B.1@149.935,150.365 149.935,150.866 151.806,152.737 R24.2@151.806,152.787
PE6: CN11.62 M2B.8 R17.1 | length 69.2
  Top Layer w0.2: CN11.62@42.273,127 42.273,127.036 43.598,128.361 43.598,131.121 58.822,146.345 94.275,146.345 96.482,148.552 M2B.8@96.482,149.753 96.482,152.192 95.938,152.737 R17.1@95.888,152.737
PE7: CN12.44 IC2.5 | length 55
  Top Layer w0.2: CN12.44@65.133,66.04 65.133,63.239 72.343,56.029 112.355,56.029 IC2.5@113.735,54.649
PE8: CN12.40 IC2.4 | length 49
  Top Layer w0.2: CN12.40@70.213,66.04 70.475,65.778 70.475,65.301 79.007,56.769 113.411,56.769 IC2.4@114.633,55.547
PE9: CN12.52 IC2.8 | length 61.8
  Top Layer w0.2: v1(62.484,62.103) 71.247,53.34 109.563,53.34 ; 109.563,53.333 IC2.8@110.941,51.955
  Bottom Layer w0.2: CN12.52@54.973,66.04 58.9,62.113 v1@62.474,62.113
PE10: CN12.47 IC2.7 | length 60.5
  Top Layer w0.2: CN12.47@60.053,68.58 61.33,67.303 61.33,64.527 71.626,54.231 110.342,54.231 IC2.7@112.193,52.38
PE11: CN12.56 IC3.4 | length 8.8
  Top Layer w0.2: CN12.56@49.893,66.04 49.893,64.715 54.145,60.463 IC3.4@54.145,59.003
PE12: B7.3 CN12.49 PORT-7.4 | length 59.6
  Top Layer w0.2: CN12.49@57.513,68.58 57.513,68.471 57.622,68.471 58.728,67.365 58.728,65.164 61.087,62.805 61.087,61.341 61.087,61.177 61.087,61.013 85.036,37.064 85.036,26.45 PORT-7.4@85.063,26.423
  Bottom Layer w0.2: PORT-7.4@85.063,26.423 85.24,26.246 85.24,25.585 B7.3@88.787,22.038
PE13: CN12.55 IC3.3 | length 11.9
  Top Layer w0.2: CN12.55@49.893,68.58 49.893,68.471 50.002,68.471 51.108,67.365 51.108,64.78 55.424,60.464 55.424,59.013 IC3.3@55.415,59.003
PE14: CN12.51 IC3.1 | length 11.1
  Top Layer w0.2: CN12.51@54.973,68.58 55.235,68.318 55.235,67.496 56.261,66.47 56.261,62.479 57.705,61.035 57.705,58.881 IC3.1@57.912,58.674
PE15: CN12.53 IC3.2 | length 11.5
  Top Layer w0.2: CN12.53@52.433,68.58 52.695,68.318 52.695,67.496 53.758,66.433 53.758,63.292 56.515,60.535 IC3.2@56.515,58.801
PF2: CN11.52 M4B.8 R23.1 | length 107.3
  Top Layer w0.2: CN11.52@54.973,127 53.733,128.24 53.733,130.387 64.443,141.097 138.43,141.097 143.563,146.23 143.563,149.412 M4B.8@143.563,149.753 143.563,152.466 R23.1@143.291,152.737 ; M4B.8@143.554,149.412 M4B.8@143.554,149.753
PF3: CN12.58 IC3.6 | length 8.8
  Top Layer w0.2: CN12.58@47.353,66.04 47.353,64.623 51.605,60.371 IC3.6@51.605,59.003
PF4_ADC: CN12.38 PORT-6.1 | length 62.3
  Bottom Layer w0.2: CN12.38@72.753,66.04 71.47,67.323 71.47,69.42 72.08,70.03 76.01,70.03 76.571,69.469 76.571,62.588 101.352,37.807 101.352,33.778 PORT-6.1@106.167,28.963
PF5_ADC: B6.3 CN12.36 PORT-6.5 | length 57.2
  Bottom Layer w0.2: CN12.36@75.293,66.04 75.293,62.993 100.662,37.624 100.662,29.68 101.087,29.254 PORT-6.5@101.087,28.963 102.364,27.686 103.002,27.686 103.632,27.056 103.632,24.325 105.899,22.058 B6.3@106.028,22.058
PF6_UART7_RX: CN11.9 UART.4 | length 65.9
  Bottom Layer w0.2: CN11.9@108.313,129.54 108.575,129.278 108.575,128.456 109.528,127.503 109.528,125.404 112.584,122.348 163.032,122.348 166.959,126.275 166.959,126.978 UART.4@167.114,127.134
PF7_UART7_TX: CN11.11 UART.1 | length 75.6
  Bottom Layer w0.2: CN11.11@105.773,129.54 106.035,129.278 106.035,128.456 107.098,127.393 107.098,125.929 111.511,121.516 166.929,121.516 170.915,125.502 UART.1@170.915,129.665
PF8_ADC: CN11.54 M2B.1 R15.2 | length 47.1
  Top Layer w0.2: M2B.1@78.702,149.753 81.249,152.299 81.249,152.437 R15.2@81.599,152.787
  Bottom Layer w0.2: CN11.54@52.433,127 52.433,127.116 53.758,128.441 53.758,140.626 56.134,143.002 68.961,143.002 75.712,149.753 M2B.1@78.702,149.753
PF9_ADC: CN11.56 M4B.7 R22.1 | length 108.2
  Top Layer w0.2: CN11.56@49.893,127 51.169,128.276 51.169,131.258 61.897,141.986 137.922,141.986 140.97,145.034 M4B.7@140.97,149.753 ; M4B.7@141.023,149.753 141.023,152.321 141.439,152.737 R22.1@141.489,152.737
PF10_ADC: CN12.42 PORT-7.1 | length 45.9
  Top Layer w0.2: v1(67.67,55.667) 67.719,55.667 85.819,37.567 85.819,32.926 88.9,29.845 88.9,28.989 PORT-7.1@88.873,28.963
  Bottom Layer w0.2: v1(67.67,55.667) 67.693,55.689 67.696,55.689 67.696,66.017 CN12.42@67.673,66.04
PF11: CN12.62
PF12: CN12.59 PORT-9.1 | length 51.2
  Top Layer w0.2: CN12.59@44.813,68.58 44.813,69.673 44.202,70.284 41.705,70.284 41.058,69.637 41.058,49.161 51.435,38.784 51.435,31.75 53.848,29.337 PORT-9.1@54.102,29.337
PF13: CN12.57 IC3.5 | length 11.9
  Top Layer w0.2: CN12.57@47.353,68.58 48.678,67.255 48.678,64.824 52.875,60.627 IC3.5@52.875,59.003
PF14_I2C4_SCL: CN12.50 PORT-8.1 | length 42.9
  Top Layer w0.2: CN12.50@57.513,66.04 57.513,62.277 70.264,49.526 70.264,30.277 PORT-8.1@71.578,28.963
PF15_I2C4_SDA: CN12.60 PORT-8.4 T8.3 | length 61.3
  Bottom Layer w0.2: CN12.60@44.813,66.04 44.888,66.04 48.19,62.738 54.864,62.738 67.437,50.165 67.437,32.455 65.278,30.296 65.278,28.157 66.783,26.652 67.539,26.652 PORT-8.4@67.768,26.423 64.262,22.916 64.262,22.775 63.824,22.338 T8.3@63.824,22.038
PG0: CN11.59 M3B.1 R18.2 | length 70.2
  Top Layer w0.2: CN11.59@44.813,129.54 45.048,129.775 45.048,130.667 59.861,145.48 97.97,145.48 M3B.1@102.243,149.753 ; M3B.1@102.362,149.872 102.855,150.365 102.855,150.911 104.681,152.737 R18.2@104.681,152.787
PG1: CN11.58 M4B.1 R21.2 | length 94.7
  Top Layer w0.2: CN11.58@47.353,127 47.615,127.262 47.615,127.852 48.641,128.878 48.641,130.134 61.382,142.875 122.08,142.875 125.73,146.525 125.73,149.7 M4B.1@125.783,149.753 125.783,150.692 127.477,152.387 127.527,152.387 127.877,152.737 R21.2@127.877,152.787
PG2: B2.3 CN11.42 PORT-2.1 | length 165.3
  Top Layer w0.2: CN11.42@67.673,127 67.673,123.929 106.458,85.144 133.252,85.144 174.088,44.308 174.088,31.985 174.811,31.262 174.811,29.497 PORT-2.1@175.346,28.963
  Bottom Layer w0.2: B2.3@175.26,22.038 175.346,22.124 PORT-2.1@175.346,28.963
PG3: CN11.44 PORT-2.4 T2.3 | length 168.9
  Top Layer w0.2: CN11.44@65.133,127 65.133,125.295 106.115,84.313 133.134,84.313 173.15,44.298 173.15,31.285 174.045,30.389 174.045,28.399 172.299,26.652 171.765,26.652 PORT-2.4@171.536,26.423
  Bottom Layer w0.2: T2.3@167.592,22.038 168.192,22.638 168.192,23.079 PORT-2.4@171.536,26.423
PG4: CN12.69
PG5: CN12.68
PG6: CN12.70 PORT-10.4 T10.3 | length 46.4
  Top Layer w0.2: CN12.70@32.113,66.04 32.113,65.669 32.711,65.071 32.711,32.258 33.179,31.79 PORT-10.4@33.179,26.139
  Bottom Layer w0.2: T10.3@29.235,22.038 29.835,22.638 29.835,22.732 32.95,25.846 32.95,26.193 PORT-10.4@33.179,26.423
PG7: CN12.67
PG8: CN12.66
PG9: CN11.63 M1B.8 R14.1 | length 45.8
  Top Layer w0.2: R14.1@72.366,152.737 73.152,151.951 73.152,149.962 M1B.8@72.942,149.753
  Bottom Layer w0.2: CN11.63@39.733,129.54 40.104,129.54 40.465,129.902 40.506,129.902 54.368,143.764 68.326,143.764 72.942,148.38 M1B.8@72.942,149.753
PG10: CN11.66
PG11: B10.3 CN11.70 PORT-10.1 | length 107
  Top Layer w0.2: CN11.70@32.113,127 33.355,125.758 33.355,32.558 PORT-10.1@36.97,28.943
  Bottom Layer w0.2: B10.3@36.903,22.038 36.989,22.124 PORT-10.1@36.989,28.963
PG12: CN11.65
PG13: CN11.68 M1B.7 R13.1 | length 51.3
  Top Layer w0.2: M1B.7@70.402,149.753 70.402,152.574 R13.1@70.612,152.784
  Bottom Layer w0.2: CN11.68@34.653,127 34.763,127 35.978,128.215 35.978,130.974 37.253,132.249 41.677,132.249 53.827,144.399 67.437,144.399 70.371,147.333 70.371,149.722 M1B.7@70.402,149.753
PG14: CN12.61 IC3.7 | length 13.3
  Top Layer w0.2: CN12.61@42.273,68.58 43.561,67.292 43.561,65.405 47.613,61.353 49.518,61.353 50.292,60.579 IC3.7@50.292,59.69
PG15: CN11.64
POW_1A: IC1.18 PORT-1.3 | length 68.4
  Top Layer w0.3: IC1.18@142.932,71.152 142.932,71.115 167.778,46.27 v3(167.778,46.233)
  Bottom Layer w0.3: v3@167.778,46.211 169.885,44.104 181.338,44.104 190.1,35.341 PORT-1.3@190.1,28.963
POW_1B: IC1.16 PORT-1.7 | length 65.9
  Top Layer w0.3: IC1.16@141.136,69.356 141.419,69.356 141.419,69.193 164.511,46.101 v3(164.592,46.101)
  Bottom Layer w0.3: v3(164.592,46.101) 168.547,42.146 180.631,42.146 185.02,37.757 PORT-1.7@185.02,28.963
POW_1C: IC1.17 PORT-1.5 | length 67.5
  Top Layer w0.3: IC1.17@142.034,70.254 142.476,69.812 142.949,69.812 166.382,46.378 v3(166.382,45.791)
  Bottom Layer w0.3: v3(166.382,45.791) 169.042,43.131 181.096,43.131 187.56,36.667 PORT-1.5@187.56,28.963
POW_2A: IC1.15 PORT-2.3 | length 53
  Top Layer w0.3: IC1.15@140.238,68.458 140.238,68.175 140.801,67.611 140.801,67.606 171.323,37.084 171.323,30.445 PORT-2.3@172.806,28.963
POW_2B: IC1.13 PORT-2.7 | length 49.9
  Top Layer w0.3: IC1.13@138.442,66.661 138.442,66.379 138.725,66.379 167.64,37.464 167.64,29.464 PORT-2.7@167.894,29.21
  Bottom Layer w0.3: PORT-2.7@167.683,29.005 PORT-2.7@167.726,28.963
POW_2C: IC1.14 PORT-2.5 | length 51.5
  Top Layer w0.3: IC1.14@139.34,67.559 139.578,67.559 170.266,36.871 PORT-2.5@170.266,28.963
POW_3A: IC1.12 PORT-3.3 | length 44.3
  Top Layer w0.3: IC1.12@137.544,65.763 137.544,65.627 152.908,50.263 v3(152.908,41.91)
  Bottom Layer w0.3: v3(152.908,41.91) 152.889,41.891 152.889,31.585 PORT-3.3@155.511,28.963
POW_3B: IC1.11 PORT-3.7 | length 43.1
  Top Layer w0.3: IC1.11@136.646,64.865 136.888,64.865 151.962,49.791 151.962,40.189 v3(152.019,40.132)
  Bottom Layer w0.3: PORT-3.7@150.431,28.963 150.431,29.088 152.051,30.708 152.051,40.1 v3(152.019,40.132)
POW_4A: IC2.18 PORT-4.3 | length 28.6
  Top Layer w0.3: IC2.18@124.009,51.559 124.009,51.496 124.861,50.644 124.705,50.488 124.705,50.441 133.967,41.179 133.967,33.499 138.217,29.25 PORT-4.3@138.217,28.963
POW_4B: IC2.17 PORT-4.7 | length 25.4
  Top Layer w0.3: IC2.17@123.365,50.188 123.648,50.188 124.211,49.624 124.217,49.624 133.137,40.705 PORT-4.7@133.137,28.963
POW_5A: IC2.16 PORT-5.3 | length 22.3
  Top Layer w0.3: PORT-5.3@120.922,28.963 120.922,35.451 124.049,38.578 124.049,47.708 IC2.16@122.467,49.29
POW_5B: IC2.15 PORT-5.7 | length 23.2
  Top Layer w0.3: PORT-5.7@115.842,28.963 115.842,31.523 123.219,38.899 123.219,46.742 IC2.15@121.569,48.392
POW_6A: IC2.14 PORT-6.3 | length 32.9
  Top Layer w0.3: PORT-6.3@103.627,28.963 103.788,29.123 103.788,29.829 105.489,31.531 114.586,31.531 122.311,39.255 122.311,46.073 IC2.14@120.417,47.967
POW_6B: IC2.13 PORT-6.7 | length 34.7
  Top Layer w0.3: PORT-6.7@98.547,28.963 102.028,32.444 114.179,32.444 121.14,39.405 121.14,45.229 IC2.13@119.773,46.595
POW_7A: IC2.12 PORT-7.3 | length 48.3
  Top Layer w0.3: v1@88.447,38.131 117.2,38.131 120.251,41.183 120.251,44.321 118.966,45.607 118.875,45.607 IC2.12@118.875,45.697
  Bottom Layer w0.3: PORT-7.3@86.333,28.963 86.333,36.017 v1@88.447,38.131
  other v1: 88.519,38.1
POW_7B: IC2.11 PORT-7.7 | length 49.2
  Top Layer w0.3: v1@88.46,39.624 117.549,39.624 119.362,41.437 119.362,43.414 IC2.11@117.977,44.799
  Bottom Layer w0.3: PORT-7.7@81.253,28.963 81.253,32.417 v1@88.46,39.624
  other v1: 88.519,39.624
POW_8A: IC3.18 PORT-8.3 | length 25.2
  Top Layer w0.3: IC3.18@57.955,49.553 58.094,49.414 58.094,47.809 69.038,36.865 PORT-8.3@69.038,28.963
POW_8B: IC3.17 PORT-8.7 | length 23.6
  Top Layer w0.3: IC3.17@56.685,49.553 56.754,49.484 v1@56.754,48.021 ; v1(56.769,48.006) 56.769,47.971 63.958,40.782 PORT-8.7@63.958,28.963
POW_9A: IC3.16 PORT-9.3 | length 22.1
  Top Layer w0.3: v1(54.803,43.418) 55.415,44.03 IC3.16@55.415,49.553
  Bottom Layer w0.3: PORT-9.3@51.744,28.963 51.744,40.359 v1(54.803,43.418)
POW_9B: IC3.15 PORT-9.7 | length 23.5
  Top Layer w0.3: v1@53.086,43.327 54.298,44.538 54.298,49.4 IC3.15@54.145,49.553
  Bottom Layer w0.3: PORT-9.7@46.863,29.21 46.863,29.553 50.632,33.321 50.632,40.853 v1(53.086,43.307)
POW_10A: IC3.14 PORT-10.3 | length 31.9
  Top Layer w0.3: v1(50.292,44.323) 52.875,46.906 IC3.14@52.875,49.553
  Bottom Layer w0.3: PORT-10.3@34.417,29.019 34.417,34.799 41.782,42.164 48.133,42.164 v1(50.292,44.323)
POW_10B: IC3.12 PORT-10.7 | length 32.5
  Top Layer w0.3: v1(48.768,46.101) 50.335,47.668 IC3.12@50.335,49.553
  Bottom Layer w0.3: PORT-10.7@29.337,29.204 29.337,32.566 41.602,44.831 47.498,44.831 v1(48.768,46.101)
POW_10C: IC3.13 PORT-10.5 | length 32.3
  Top Layer w0.3: v1(51.562,48.133) 51.583,48.154 51.583,49.532 IC3.13@51.605,49.553
  Bottom Layer w0.3: PORT-10.5@32.004,28.925 32.004,33.831 41.48,43.307 47.498,43.307 51.562,47.371 v1(51.562,48.133)
pads on no net: CN11.5 CN11.10 CN11.12 CN11.14 CN11.18 CN11.24 CN11.26 CN11.29 CN11.31 CN11.33 CN11.51 CN11.53 CN11.67 CN12.7 CN12.8 CN12.12 CN12.14 CN12.32 CN12.33 HDMI_IO.13 HDMI_IO.14 HDMI_IO.15 HDMI_IO.16 HDMI_IO.18 HDMI_IO.19 HDMI_IO.20 HDMI_IO.21 HDMI_IO.22 HDMI_IO.23 I2S_2.1 IC3.11 J1.3 J2.3 M1B.2 M1B.3 M1B.4 M1B.5 M1B.6 M2B.2 M2B.3 M2B.4 M2B.5 M2B.6 M3B.2 M3B.3 M3B.4 M3B.5 M3B.6 M4B.2 M4B.3 M4B.4 M4B.5 M4B.6 M5B.2 M5B.3 M5B.4 M5B.5 M5B.6 M6B.2 M6B.3 M6B.4 M6B.5 M6B.6 M7B.2 M7B.3 M7B.4 M7B.5 M7B.6 M8B.2 M8B.3 M8B.4 M8B.5 M8B.6 Photometry.MH1 Photometry.MH2 PORT-1.MH1 PORT-1.MH2 PORT-2.MH1 PORT-2.MH2 PORT-3.MH1 PORT-3.MH2 PORT-4.MH1 PORT-4.MH2 PORT-5.MH1 PORT-5.MH2 PORT-6.MH1 PORT-6.MH2 PORT-7.MH1 PORT-7.MH2 PORT-8.MH1 PORT-8.MH2 PORT-9.MH1 PORT-9.MH2 PORT-10.MH1 PORT-10.MH2 SPI_BUS?.7 SPI_BUS?.8 U1_5V_.2 U1_5V_.3 UART.3 UART.8 UART.MH1 UART.MH2
copper on no net:
  other v12: 181.229,67.945

## Polygon pours and split planes (outlines as drawn)
GND on Top Layer "GND" (solid, remove dead copper, pour order 0): 13.526,176.53 13.78,176.784 208.217,176.784 208.217,12.446 208.09,12.573 11.621,12.573
GND on Bottom Layer "GND" (solid, remove dead copper, pour order 1): 13.526,175.768 13.78,175.514 207.201,175.514 207.201,12.192 207.455,11.938 12.637,11.938